# Altium PCB PreAmpli.PcbDoc
Units mm, origin at the board's own origin, x right, y up, seen from the top; angles counter-clockwise.
Board outline 33.02 x 31.5 mm, 2 copper layers (Top Layer, Bottom Layer); 12 components, 8 nets, 28 pads, 1 vias.
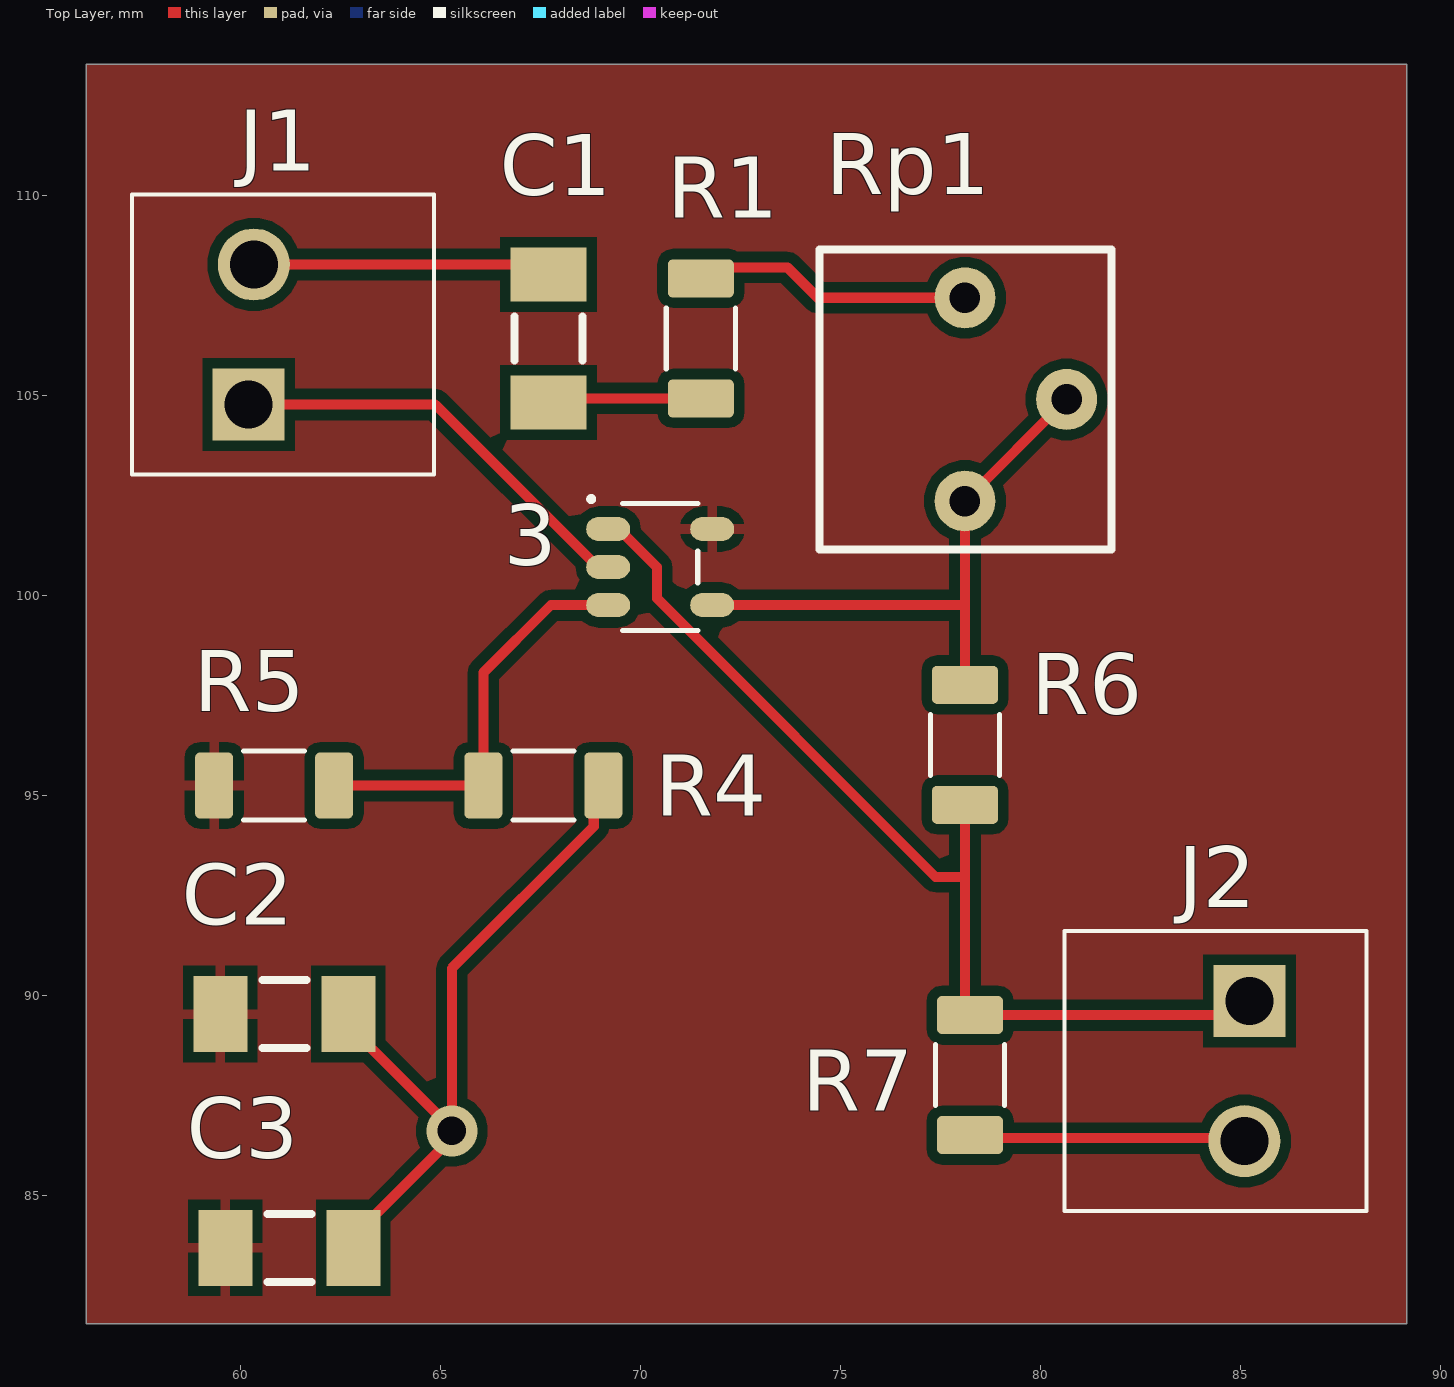
[diagram p0: Top Layer view]
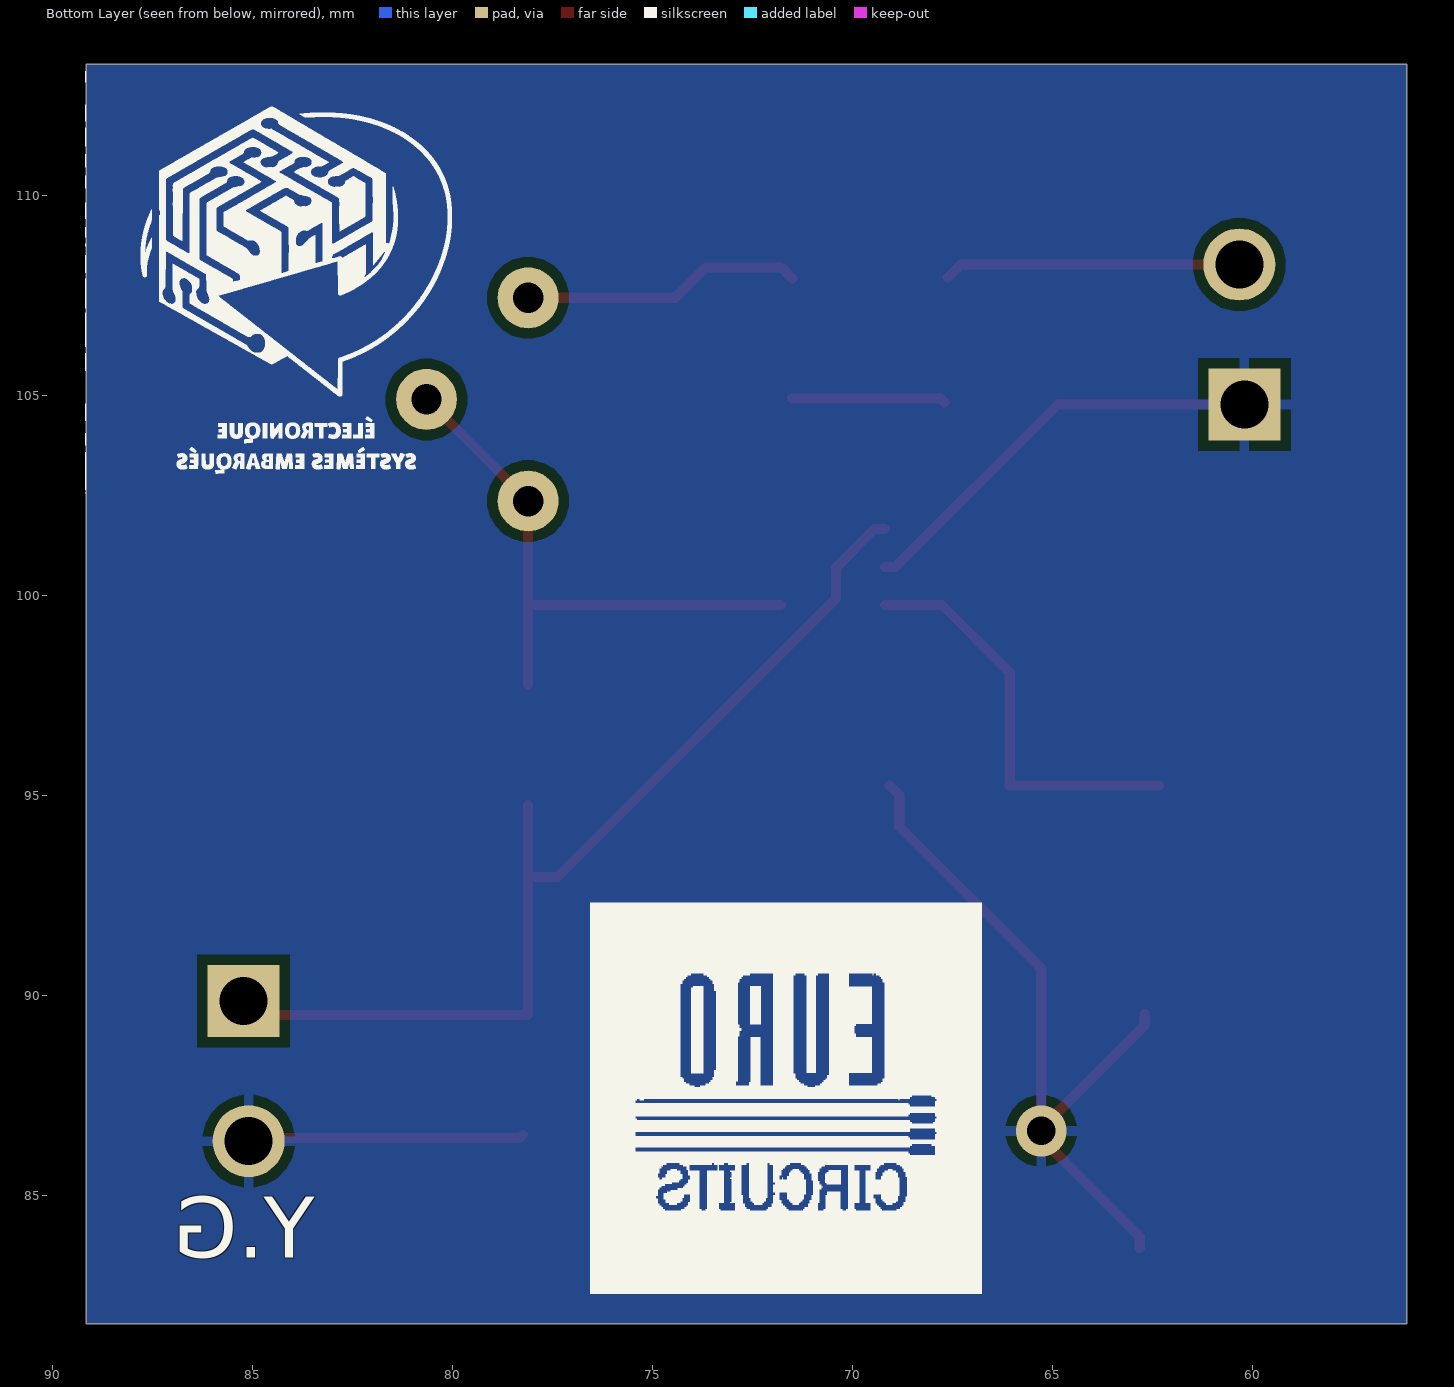
[diagram p1: Bottom Layer view, seen from below]

## Layer stack, top to bottom
Top Solder: solder mask 0.0102, Solder Resist, Dk 3.5
Top Layer: signal copper 0.0356
Dielectric 1: dielectric 0.32, FR-4, Dk 4.8
Bottom Layer: signal copper 0.0356
Bottom Solder: solder mask 0.0102, Solder Resist, Dk 3.5

## Board outline
56.134,81.788 89.154,81.788 89.154,113.284 56.134,113.284

## Design rules (kind name [scope] priority, off if disabled: settings)
Clearance [All] p1: gap=0.254 ignorepadtopadclearanceinfootprint=FALSE
PolygonConnect [All] p1: connectstyle=Relief reliefconductorwidth=0.254 reliefentries=4 polygonreliefangle="90 Angle" airgapwidth=0.254
RoutingVias [All] p1: holewidth=0.711 width=1.27 viastyle="Through Hole" minholewidth=0.711 minwidth=1.27 maxholewidth=0.711 maxwidth=1.27
SolderMaskExpansion [All] p1: expansion=0 istentingtop=FALSE
SupplyNets "Schematic Supply Nets_1" [InNet('+5V')] p1: voltage=0.000
SupplyNets "Schematic Supply Nets" [InNet('GND')] p2: voltage=0.000
Width [All] p1: maxlimit=0.254 minlimit=0.254 preferedwidth=0.254
30 further rules are at their usual default settings.

## Components (designator, comment, footprint, x,y, rotation, side; value= is the part's Value field where it differs from the comment)
3 "3" AOP-1671IDBVR 70.485,100.711 r0 top
C1 "1.5 uF" CAPACITOR_1206 67.691,106.426 r270 top value=100nF
C2 "1µF" CAPACITOR_1206 61.087,89.535 r180 top value=100nF
C3 "1µF" CAPACITOR_1206 61.214,83.693 r180 top value=100nF
J1 "1725656" 2_Pin_Terminal 60.325,104.775 r90 top
J2 "1725656" 2_Pin_Terminal 85.09,89.86 r270 top
R1 "1k  Ω" RESISTOR_1206 71.501,106.426 r90 top
R4 "10k  Ω" RESISTOR_1206 67.564,95.25 r180 top
R5 "10k  Ω" RESISTOR_1206 60.833,95.25 r180 top
R6 "10k  Ω" RESISTOR_1206 78.105,96.266 r270 top
R7 "47k  Ω" RESISTOR_1206 78.232,88.011 r90 top
Rp1 "10k" 3362P 78.105,104.902 r270 top

## Footprints (in the part's own frame and the unit in brackets; to place one, negate y for a bottom-side part, rotate by r counter-clockwise, add the part's x,y. Pads: shape width x height; smd on the part's side, far side on the other; paste and mask are expansions set on the pad)
2_Pin_Terminal [mm]
  rect 1.8x1.8 hole 1.2: 1(0,0.127)
  round 1.8 hole 1.2: 2(3.5,0)
  silkscreen extent -1.75,-4.5 5.25,3.05
3362P [mil] "3362 - 1/4 ” Square Trimpot® Trimming Potentiometer"
  round 60 hole 30: 1(-100,0) 2(0,100) 3(100,0)
  silkscreen extent -148,-143 148,144, body extent -130,-130 130,130, height 189
AOP-1671IDBVR [mm]
  oval 1.1x0.6 smd: 1(-1.3,0.95) 2(-1.3,0) 3(-1.3,-0.95) 4(1.3,-0.95) 5(1.3,0.95)
  silkscreen extent -1.79,-1.59 0.94,1.76, body extent -0.87,-1.52 0.87,1.53, height 1.45
CAPACITOR_1206 [mm] "Chip Capacitor, Body 3.2x1.6mm, Height 1.7mm, IPC Low Density"
  rect 1.35x1.9 smd: 1(-1.6,0) 2(1.6,0)
  silkscreen extent -0.55,-0.85 0.55,0.85, body extent -1.7,-0.9 1.7,0.9, height 1.7
RESISTOR_1206 [mm]
  rrect25% 0.95x1.65 smd: 1(-1.5,0) 2(1.5,0)
  silkscreen extent -0.76,-0.86 0.76,0.86, body extent -1.6,-0.8 1.6,0.8, height 0.55

## Part data
3: library part OPA1671DBVT, "AOP"
C1 C2 C3: library part Capacitor, "Capacitor", Case-EIA=1206, Case-Metric=3216, Rated Voltage="100 V", Tolerance=Â±5%, Max Thickness="1.7 mm", Technology=SMT
J1 J2: library part "ScrewTerminal 2Pin", "2Pin Header Screw", Colour=Green, Manufacturer="Phoenix Contact", Content=250pc(s), Datasheet URL=http://datasheet.octopart.com/1725656-Phoenix-Contact-datasheet-5302866.pdf, Datasheet Version=Apr-08, Industrial packaging=Yes, Manufacturer part No.=1725656, Manufacturer URL=http://www.phoenixcontact.com/, Number of contacts=2, Pitch=2.54mm, Type=MPT0,5/2-2,54
R1 R4 R5 R6 R7: library part Resistor, "Résistance"
Rp1: library part Potentiometer, "Potentiometer"

## Via types
v1: diameter 1.27, hole 0.711, Top Layer to Bottom Layer, 1 vias

## Nets (pads, with @x,y where several pads share a name; then routed paths per layer and width w, separated by ;. In a path a pad name is that pad's centre, name@x,y a point inside that pad or via, vN(x,y) a via of type N, cw(c..) or ccw(c..) an arc to the next point about the centre after c; other vN are vias at no path point)
+5V: 3.5 C2.2 C3.2 R5.2
GND: 3.2 C2.1 C3.1 J1.1 J2.2 R4.1 R7.1 | length 35.7
  Top Layer w0.254: J1.1 64.858,104.775 68.922,100.711 3.2 ; C2.1 62.687,89.26 65.278,86.669 v1(65.278,86.614) ; C3.1 62.814,83.968 65.278,86.432 v1(65.278,86.614) ; R4.1 68.826,95.012 68.826,94.226 65.278,90.678 v1(65.278,86.614) ; R7.1 78.307,86.436 85.014,86.436 J2.2
NetC1_1: C1.1 J1.2 | length 7.4
  Top Layer w0.254: J1.2 67.29,108.275 C1.1@67.615,107.95
NetR1_2: R1.2 Rp1.1 | length 7
  Top Layer w0.254: R1.2 71.779,108.204 73.66,108.204 74.422,107.442 Rp1.1
OPA+: 3.3 R4.2 R5.1 | length 10.4
  Top Layer w0.254: R5.1 R4.2 66.064,98.068 67.757,99.761 3.3
OPA-: 3.4 R6.1 Rp1.2 Rp1.3 | length 14.5
  Top Layer w0.254: 3.4 78.105,99.761 ; R6.1 78.105,99.761 ; Rp1.2 Rp1.3 78.105,99.761
OPA-Audio-IN: C1.2 R1.1 | length 3.9
  Top Layer w0.254: C1.2 67.791,104.926 R1.1
OUT_5V: 3.1 J2.1 R6.2 R7.2 | length 25.4
  Top Layer w0.254: 3.1 69.448,101.661 70.404,100.705 70.404,99.929 77.369,92.964 78.105,92.964 ; R7.2@78.105,89.511 78.105,92.964 ; R6.2 78.105,92.964 ; R7.2 84.868,89.511 J2.1

## Polygon pours and split planes (outlines as drawn)
GND on Bottom Layer "GND_L02_P000" (solid, pour order 0): 56.134,81.788 56.134,113.284 89.154,113.284 89.154,81.788
+5V on Top Layer "+5V_L01_P004" (solid, pour order 4): 56.134,81.788 56.134,113.284 89.154,113.284 89.154,81.788 62.738,81.788

## Silkscreen, mask and mechanical layers (free items; w line width, h text height)
Bottom Overlay:
  drawing of 57 lines, arcs and shapes, not listed
  text "Y.G" at 83.439,83.439 h1.52
Mechanical 1:
  lines w0.254: 56.134,81.788 56.134,113.284 ; 56.134,81.788 89.154,81.788 ; 56.134,81.788 56.134,113.284 ; 56.134,81.788 89.154,81.788 ; 56.134,113.284 89.154,113.284 ; 56.134,113.284 89.154,113.284 ; 89.154,81.788 89.154,113.284 ; 89.154,81.788 89.154,113.284